# Altium PCB Grant..PcbDoc (part 1 of 5)
Units mil, origin at the board's own origin, x right, y up, seen from the top; angles counter-clockwise.
Board outline 2981 x 2481 mil, 2 copper layers (Top Layer, Bottom Layer), stack 57 mil thick; 181 components, 108 nets, 631 pads, 224 vias.
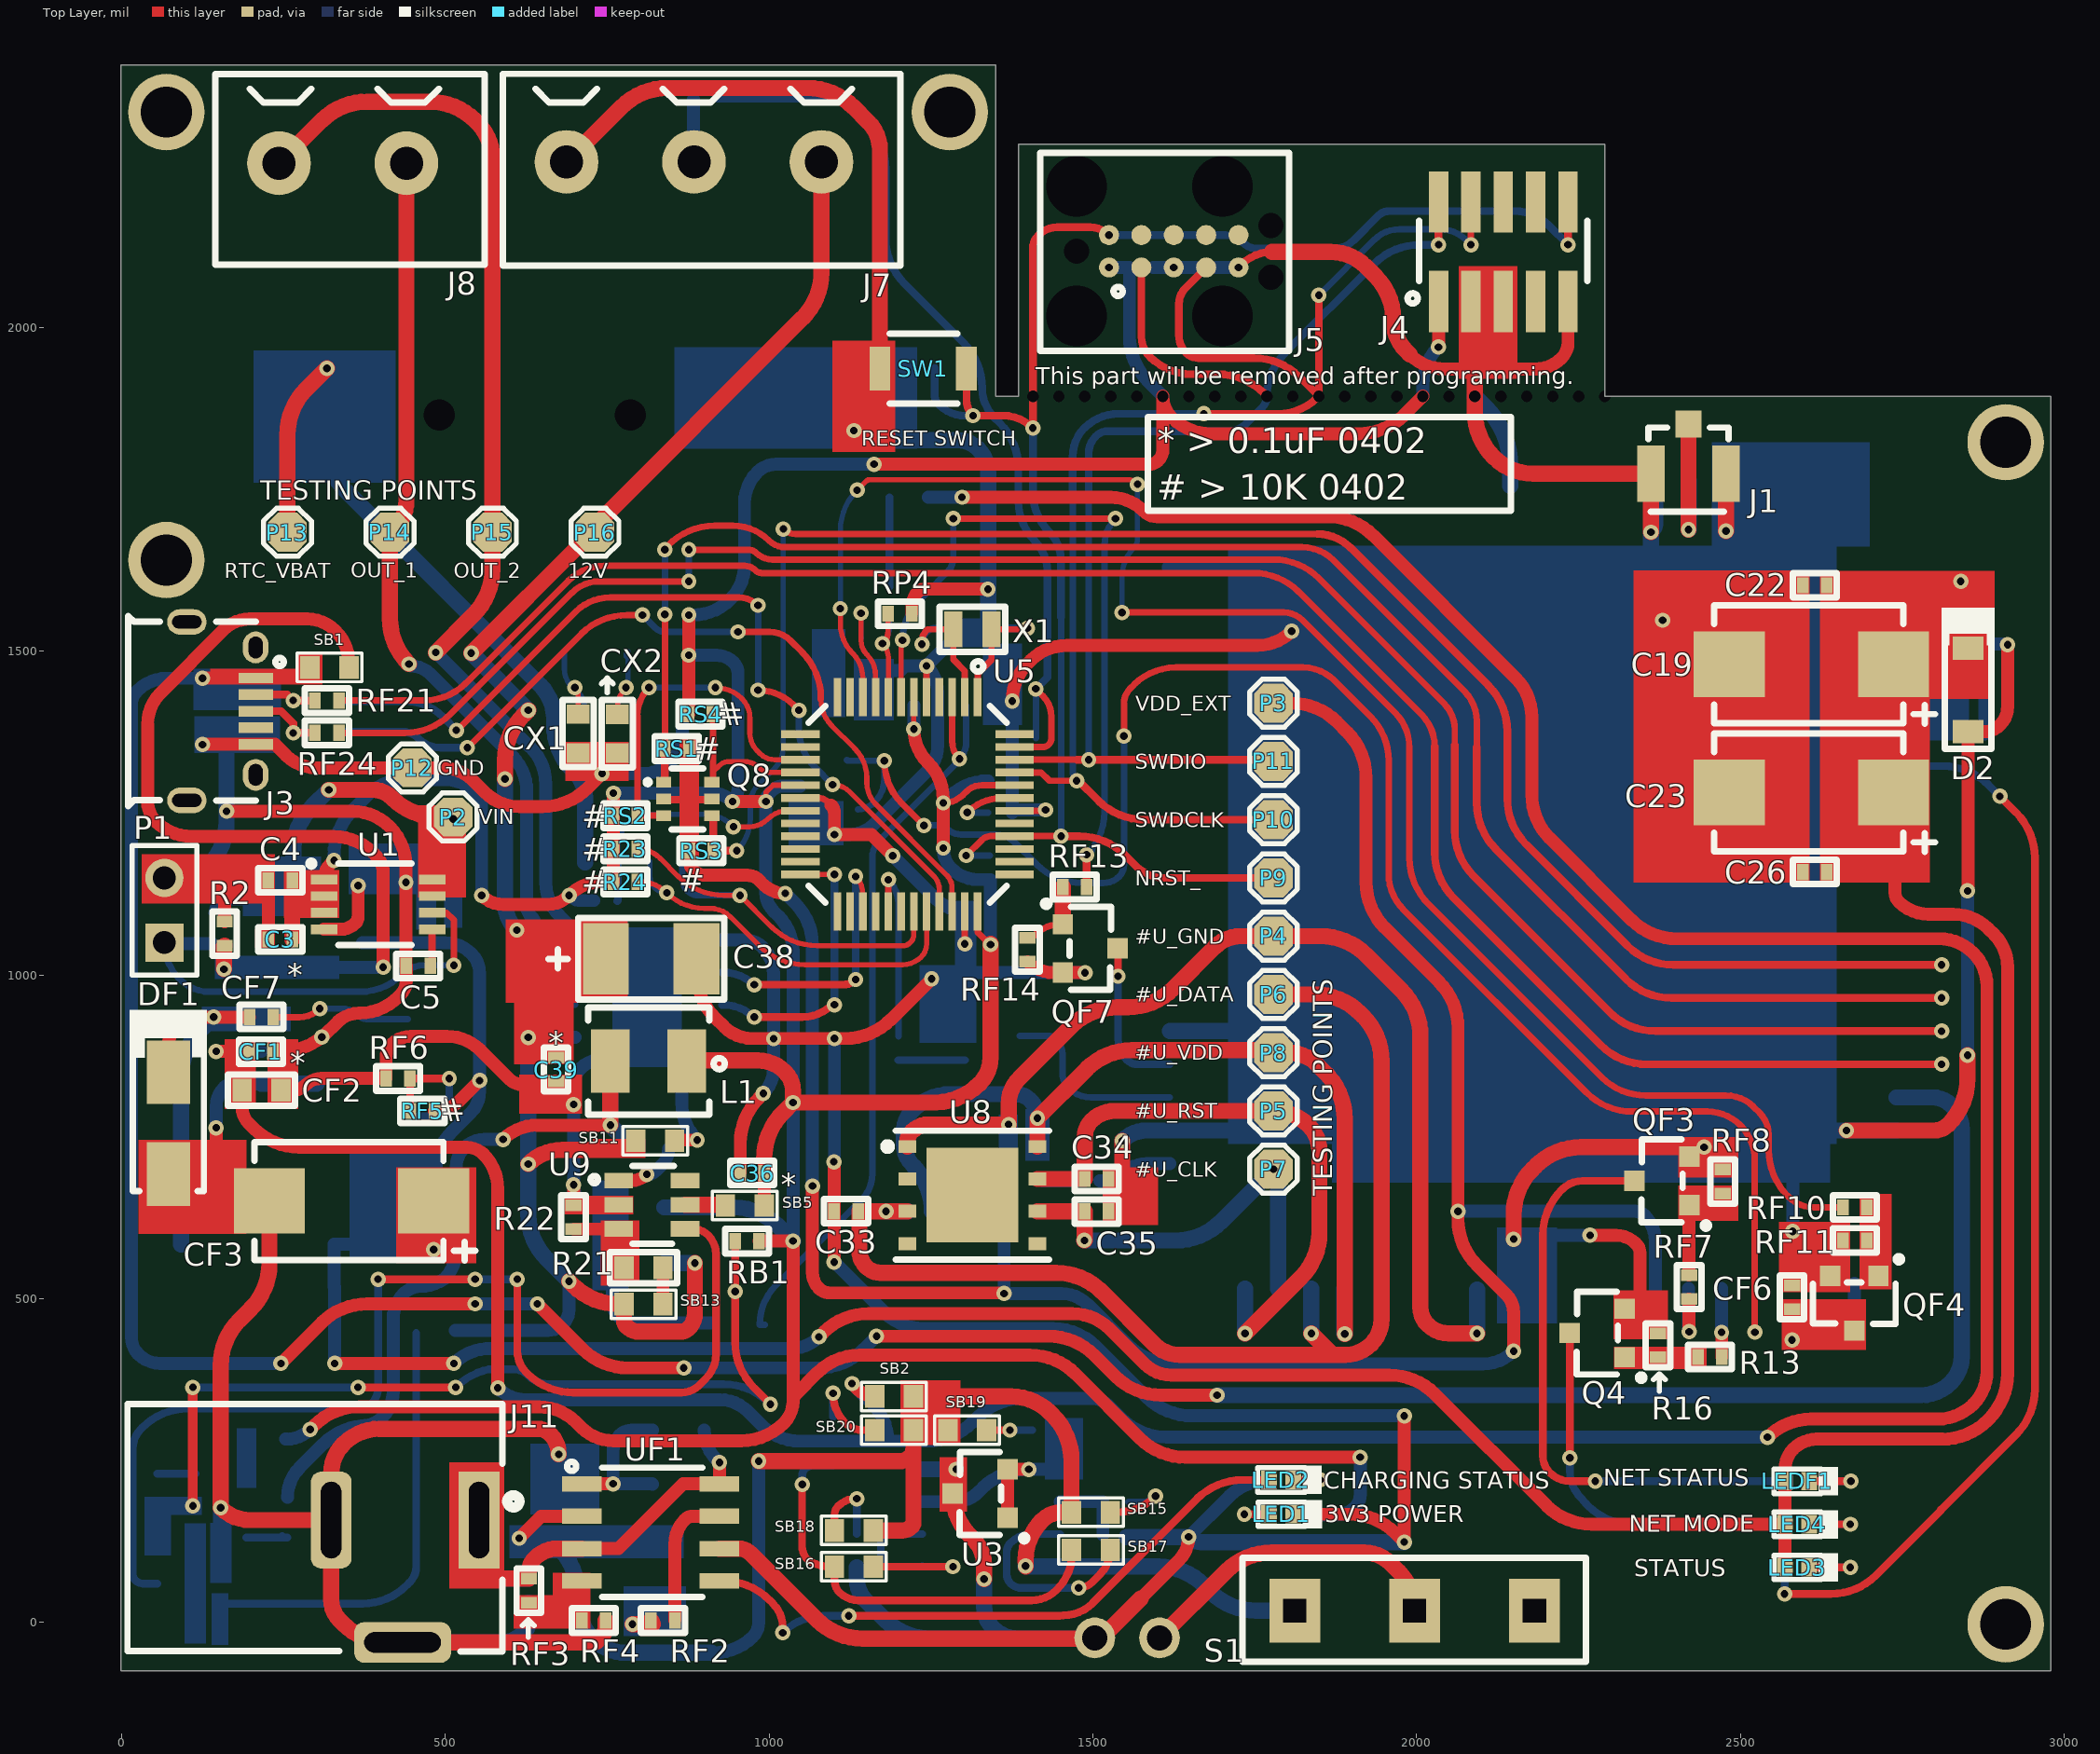
[diagram p0: Top Layer view]
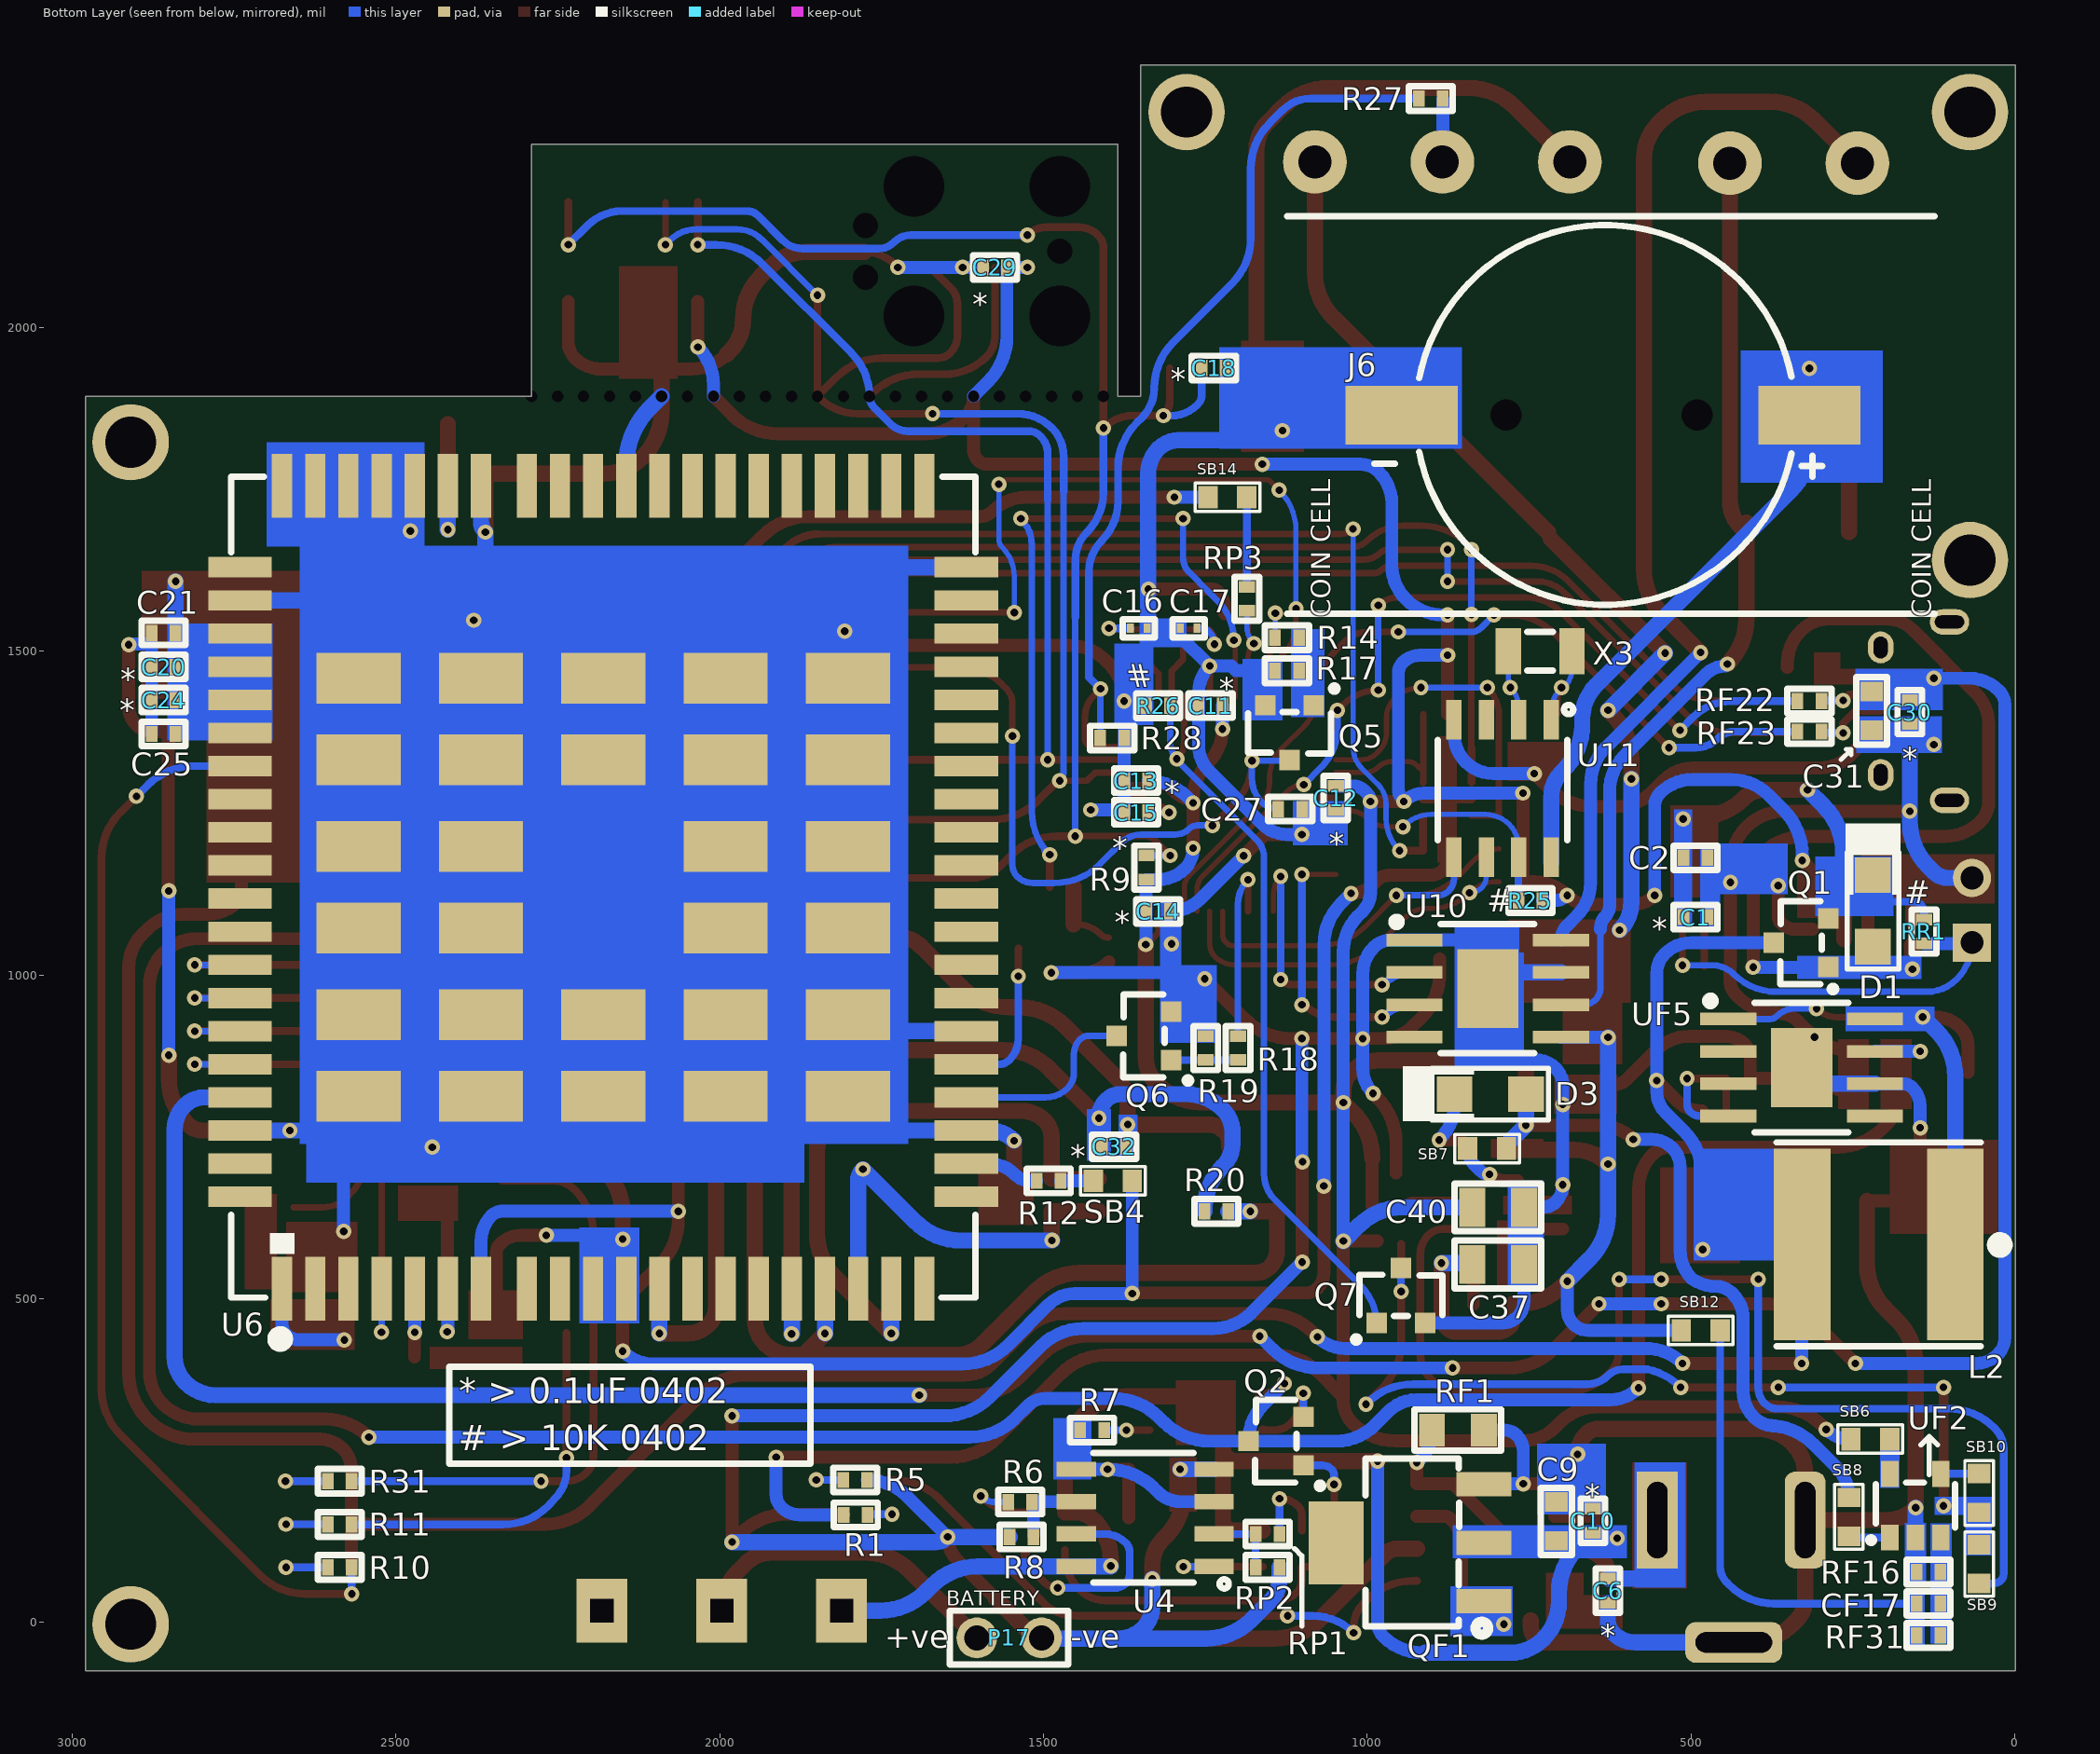
[diagram p1: Bottom Layer view, seen from below]
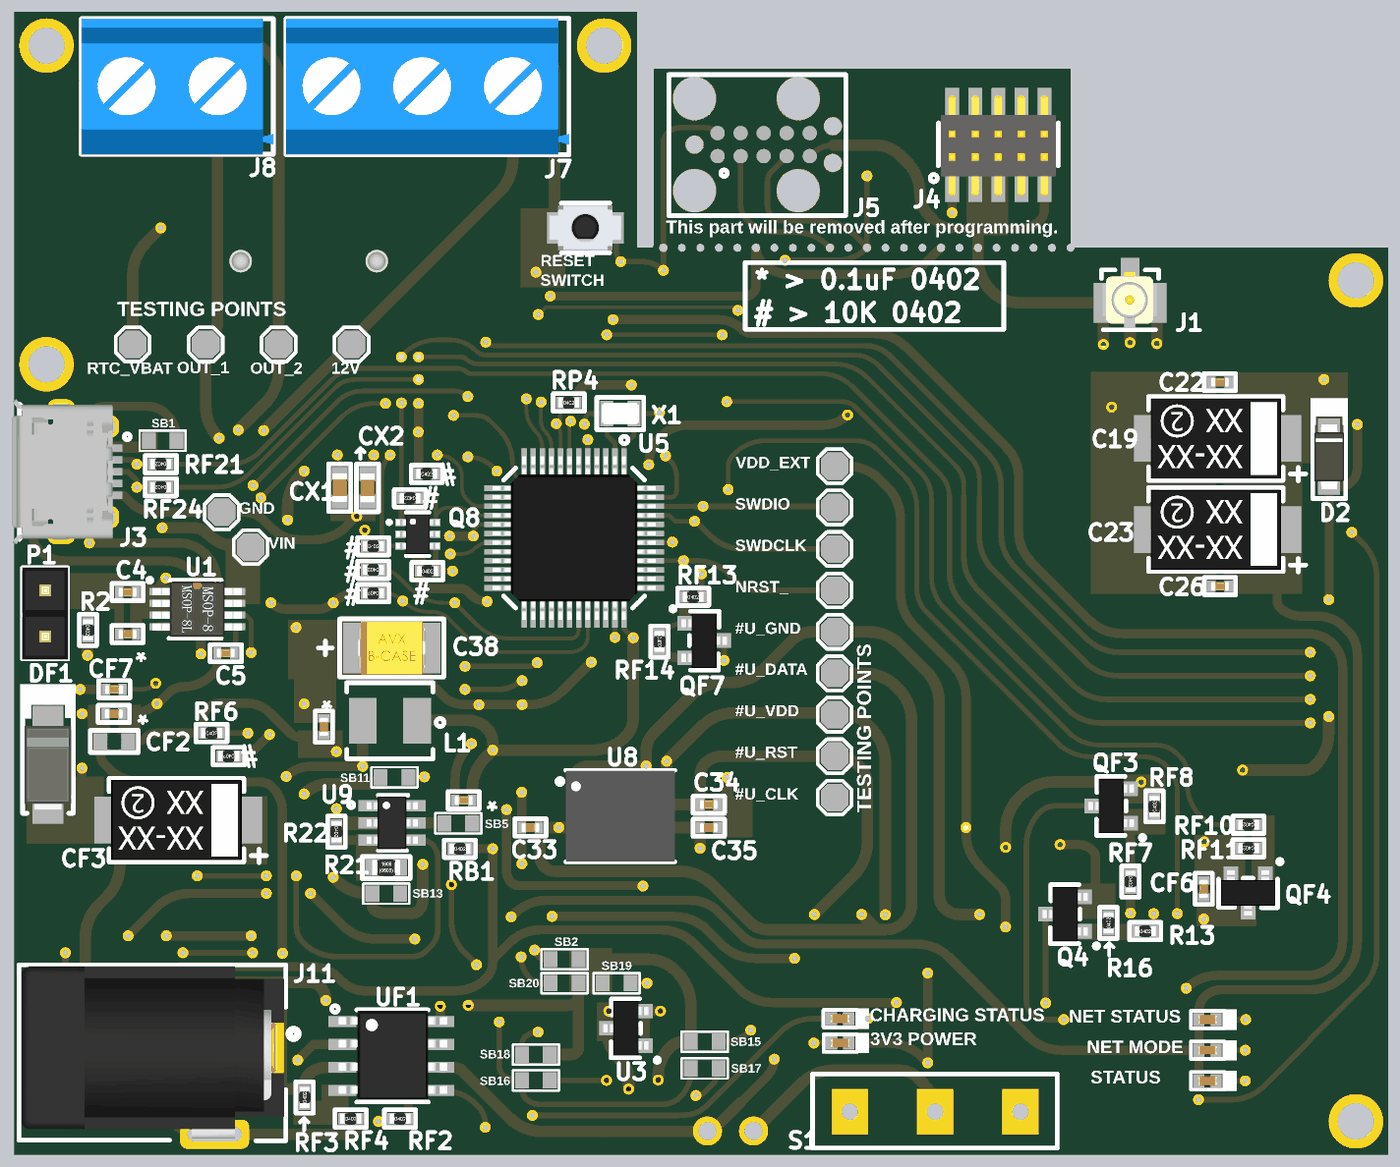
[diagram p4: 3D render of the assembled board from above, using the file's embedded part models]
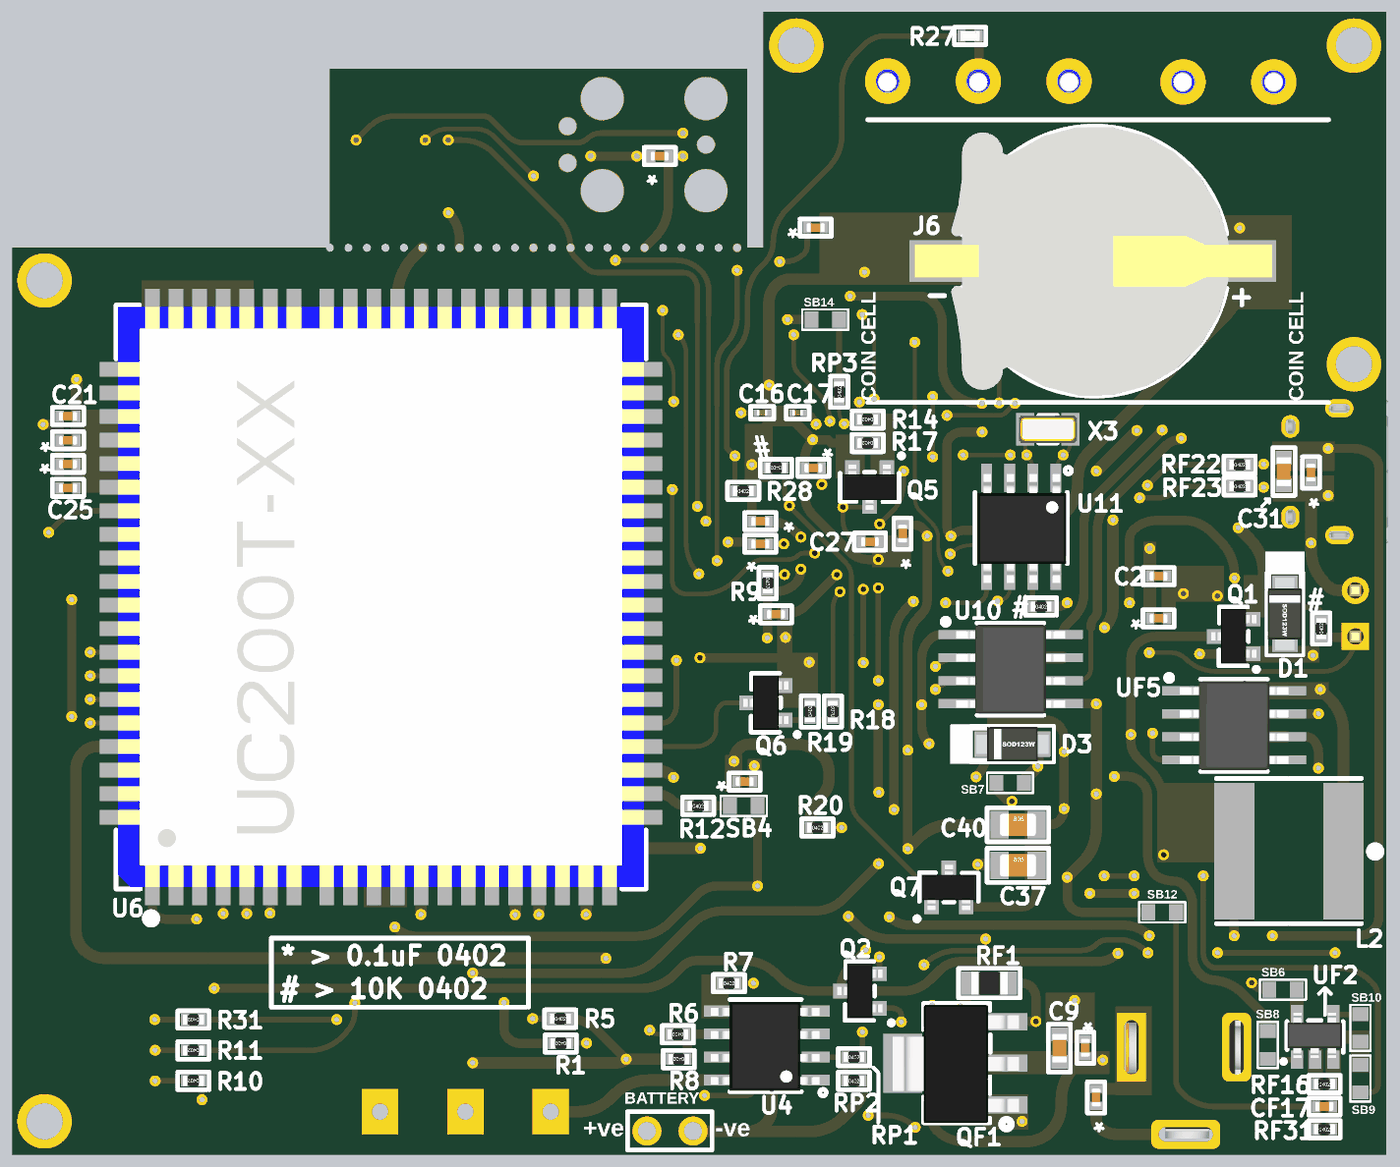
[diagram p5: 3D render of the assembled board from below, using the file's embedded part models]

## Layer stack, top to bottom
Top Solder: solder mask 3, Solder Resist, Dk 3.5
Top Layer: signal copper 10
Dielectric 1: dielectric 37, FR-4, Dk 4.8
Bottom Layer: signal copper 10
Bottom Solder: solder mask 3, Solder Resist, Dk 3.5

## Board outline
-1,-75 -1,2406 1350,2406 1350,1894 1385,1894 1385,2283 2290.83,2283 2290.83,1894 2980,1894 2980,-75

## Design rules (kind name [scope] priority, off if disabled: settings)
Clearance [All] p1: gap=7 ignorepadtopadclearanceinfootprint=FALSE
Height [All] p1: minheight=0 maxheight=10000 prefheight=500
HoleSize [All] p1: absolutevalues=TRUE maxlimit=1000 minlimit=1 maxpercent=80.000 minpercent=20.000
HoleToHoleClearance [All] p1: gap=2 allowstackedmicrovias=TRUE
MinimumSolderMaskSliver [All] p1: minsoldermaskwidth=1
PolygonConnect [All] p1: connectstyle=Relief reliefconductorwidth=10 reliefentries=4 polygonreliefangle="90 Angle" airgapwidth=10
RoutingVias [All] p1: holewidth=11.81 width=23.62 viastyle="Through Hole" minholewidth=11.81 minwidth=23.62 maxholewidth=19.68 maxwidth=39.37
SilkToSilkClearance [All] p1: silktosilkclearance=0
SilkToSolderMaskClearance [IsPad] p1: minsilkscreentomaskgap=0 clearancetoexposedcopper=TRUE
SolderMaskExpansion SolderMaskExpansion_1 [not IsVia] p1: expansion=4
SolderMaskExpansion [IsVia] p2: expansion=4 soldermaskfromhole=TRUE
Width [All] p1: maxlimit=50 minlimit=8 preferedwidth=12 minimp=50.000000 maximp=50.000000 favimp=50.000000
24 further rules are at their usual default settings.

## Classes and differential pairs
component class U_Power_Section: C1 C2 C3 C4 C5 CF1 CF2 CF3 CF7 D1 DF1 L2 LED1 P1 P2 Q1 R1 R2 RF5 RF6 RR1 SB1 U1 UF5
component class U_Peripheral_Section: C36 C37 C38 C39 C40 CF17 CX1 CX2 D3 L1 Q7 R21 R22 R23 R24 R25 R26 R27 R28 RB1 RF16 RF31 SB5 SB6 SB7 SB8 SB9 SB10 SB11 SB12 SB13 U9 U10 U11 UF2 X3
component class U_Controller_Section: C11 C12 C13 C14 C15 C16 C17 C18 Q8 R9 RS1 RS2 RS3 RS4 SW1 U5 X1
component class U_Connector_Section: C29 C30 C31 C32 C33 C34 C35 J3 J4 J5 J6 J7 J8 J11 P4 P5 P6 P7 P8 P9 P10 P11 P12 P13 P14 P15 P16 P17 R20 RF21 RF22 RF23 RF24 S1 U8
component class U_Battery_Management_Section: C6 C9 C10 LED2 Q2 QF1 R5 R6 R7 R8 RF1 RF2 RF3 RF4 RP1 RP2 RP3 RP4 SB2 SB14 SB15 SB16 SB17 SB18 SB19 SB20 U3 U4 UF1
component class "U_3G Modem_Section": C19 C20 C21 C22 C23 C24 C25 C26 C27 CF6 D2 J1 LED3 LED4 LEDF1 P3 Q4 Q5 Q6 QF3 QF4 QF7 R10 R11 R12 R13 R14 R16 R17 R18 R19 R31 RF7 RF8 RF10 RF11 RF13 RF14 SB4 U6

## Components (designator, comment, footprint, x,y, rotation, side; value= is the part's Value field where it differs from the comment)
C1 "0.1uF" Cap0402 493,1089.39 r180 bottom
C2 "1uF" Cap0402 493,1181 r180 bottom
C3 "0.1uF" Cap0402 245,1055 r180 top
C4 "1uF" Cap0402 245,1146 r180 top
C5 "10nF" Cap0402 458,1014 r0 top
C6 "0.1uF" Cap0402 628.34,49 r270 bottom
C9 "10uF" Cap0603 708,156 r270 bottom
C10 "0.1uF" Cap0402 652,157 r90 bottom
C11 "0.1uF" Cap0402 1242,1416 r0 bottom
C12 "0.1uF" Cap0402 1048.38,1273.49 r270 bottom
C13 "0.1uF" Cap0402 1357,1300 r0 bottom
C14 "0.1uF" Cap0402 1323,1098.29 r180 bottom
C15 "0.1uF" Cap0402 1357,1251 r0 bottom
C16 "20pF" "Cap 0201" 1353.01,1535.65 r0 bottom
C17 "20pF" "Cap 0201" 1276,1535.65 r180 bottom
C18 "0.1uF" Cap0402 1237,1938 r180 bottom
C19 "100uF" 16TQC100MYF 2609.85,1480 r180 top
C20 "0.1uF" Cap0402 2859,1475.82 r0 bottom
C21 "10pF" Cap0402 2859,1528.25 r0 bottom
C22 "33pF" Cap0402 2615,1602 r180 top
C23 "100uF" 16TQC100MYF 2609.85,1282 r180 top
C24 "0.1uF" Cap0402 2859,1424.32 r0 bottom
C25 "10pF" Cap0402 2859,1372.35 r0 bottom
C26 "33pF" Cap0402 2615,1159 r180 top
C27 "10nF" Cap0402 1119,1256 r0 bottom
C29 "0.1uF" Cap0402 1575.12,2093 r0 bottom
C30 "0.1uF" Cap0402 162,1406 r270 bottom
C31 "4.7UF" Cap0603 221,1408 r90 bottom
C32 "0.1uF" Cap0402 1391,735 r180 bottom
C33 "33pF" Cap0402 1119,635 r180 top
C34 "33pF" Cap0402 1506,685 r0 top
C35 "33pF" Cap0402 1506,635 r0 top
C36 "0.1uF" Cap0402 974,694 r180 top
C37 "22uF" Cap0805 798,553 r180 bottom
C38 "4.7UF" TAJB475K035RNJ 817,1022 r180 top locked
C39 "0.1uF" Cap0402 671,854 r270 top
C40 "22uF" Cap0805 798,641 r180 bottom
CF1 "0.1uF" Cap0402 215,882 r0 top
CF2 "10uF" Cap0603 216,822 r180 top
CF3 "220uF" CAP2917 355,651 r180 top
CF6 "10nF" Cap0402 2580,502 r270 top
CF7 "10nF" Cap0402 216,935 r180 top
CF17 "220pF" Cap0402 133,29 r0 bottom
CX1 "12pF" Cap0603 705,1373 r270 top locked
CX2 "12pF" Cap0603 765.5,1372.79 r270 top locked
D1 "PMEG3010ER,115" SOD123W 219,1099 r90 bottom
D2 "BZD27C5V1P_R1_00001" BZD27C5V1P_R1_00001 2852,1440.35 r90 top value=Custom
D3 "PMEG3010ER,115" SOD123W 810,816 r0 bottom
DF1 "B340A-13-F" B340A-13-F 72,771 r270 top
J1 "U.FL-R-SMT-1(80)" U.FL-R-SMT-1(80) 2420,1814.65 r180 top
J3 "C10418" C10418 207,1407.57 r270 top locked
J4 "20021121-00010C4LF" 20021121-00010C4LF 2134,2117.23 r0 top locked
J5 "TC2050-IDC" TC2050-IDC 1475,2118 r0 top locked
J6 "CR1220-2" CR1220-2 632,1865 r0 bottom locked value=Cuctom
J7 "WJ301V-5.0-3P" WJ301V-5.0-3P 1080.85,2256 r180 top locked value=Custom
J8 "WJ301V-5.0-2P" WJ301V-5.0-2P 243,2254 r180 top locked value=Custom
J11 "694106301002" 694106301002 552,158 r0 top locked
L1 "MS0420-100M" MS0420-100M 813.94,867 r180 top locked value=10uH
L2 "SNR8040K-150M" SNR8040K-150M 210,584 r0 bottom locked value=15uH
LED1 "TJ-S1005SW4TGLC2R-A5" "LED 0402" 1791,167 r0 top value=Custom
LED2 "TJ-S1005SW4TGLC2R-A5" "LED 0402" 1790.7,220 r0 top value=Custom
LED3 "TJ-S1005SW4TGLC6B-A5" "LED 0402" 2588,85 r0 top value=Custom
LED4 "TJ-S1005SW4TGLC7K-A5" "LED 0402" 2588,151.5 r0 top value=Custom
LEDF1 "TJ-S1005SW4TGLC7K-A5" "LED 0402" 2588,218 r0 top value=Custom
P1 "61300211121" HDR1X2 66,1050 r90 top locked
P2 "TEST POINT" "TEST POINT" 512,1244 r0 top
P3 "Test Point" "TEST POINT" 1779,1420 r0 top
P4 "Test Point" "TEST POINT" 1779,1060 r0 top
P5 "Test Point" "TEST POINT" 1779,790 r0 top
P6 "Test Point" "TEST POINT" 1779,970 r0 top
P7 "Test Point" "TEST POINT" 1779,700 r0 top
P8 "Test Point" "TEST POINT" 1779,880 r0 top
P9 "Test Point" "TEST POINT" 1779,1150 r0 top
P10 "Test Point" "TEST POINT" 1779,1240 r0 top
P11 "Test Point" "TEST POINT" 1779,1330 r0 top
P12 "Test Point" "TEST POINT" 449,1320 r0 top
P13 "Test Point" "TEST POINT" 256,1684 r0 top
P14 "Test Point" "TEST POINT" 414.33,1684 r0 top
P15 "Test Point" "TEST POINT" 572.67,1684 r0 top
P16 "Test Point" "TEST POINT" 731,1684 r0 top
P17 "Solder Pads" "Solder Pads" 1552,-25 r180 bottom locked
Q1 "DMP2045U-7" SOT23-3 330,1050 r90 bottom locked
Q2 "PMV65XP,215" SOT23-3 1141,280 r90 bottom locked
Q4 "BSS138LT1G" SOT23-3 2279,447 r90 top
Q5 "BSS138LT1G" SOT23-3 1120,1374.37 r0 bottom locked
Q6 "BSS138LT1G" SOT23-3 1345,906 r90 bottom
Q7 "DMN13H750S-7" SOT23-3 948,505 r180 bottom
Q8 "BSS138PS,115" BSS138PS,115 874.5,1271.94 r0 top
QF1 "FZT788BTA" FZT788BTA 934,123 r90 bottom locked
QF3 "BSS138LT1G" SOT23-3 2379,682 r90 top
QF4 "BSS138LT1G" SOT23-3 2676,493 r180 top locked
QF7 "BSS138LT1G" SOT23-3 1496,1041 r270 top
R1 "470R" Res0402 1790,166 r0 bottom
R2 "100K" Res0402 159,1064 r270 top
R5 "2K" Res0402 1791,220 r180 bottom
R6 "80.6K" Res0402 1536,186 r0 bottom
R7 "30.9K" Res0402 1425,297 r180 bottom
R8 "20K" Res0402 1534,132 r0 bottom
R9 "20K" Res0402 1341,1166 r270 bottom
R10 "2.2K" Res0402 2587,85 r0 bottom
R11 "2.2K" Res0402 2587,151 r0 bottom
R12 "4.7K" Res0402 1492,682 r180 bottom
R13 "4.7K" Res0402 2453,410 r0 top
R14 "4.7K" Res0402 1124,1521 r0 bottom
R16 "47K" Res0402 2373,428 r90 top
R17 "47K" Res0402 1124,1470 r0 bottom
R18 "4.7K" Res0402 1199.61,887 r90 bottom
R19 "47K" Res0402 1249.5,887 r90 bottom
R20 "15K" Res0402 1233,635 r180 bottom
R21 "1.4M" Res0603 806,548 r0 top
R22 "71.5K" Res0402 698,626 r270 top
R23 "10K" Res0402 778,1194.75 r180 top
R24 "10K" Res0402 778,1144 r180 top
R25 "10K" Res0402 748,1115 r180 bottom
R26 "10K" Res0402 1323,1416 r0 bottom
R27 "133K" Res0402 902,2354 r180 bottom
R28 "49.9K" Res0402 1394,1366 r180 bottom
R31 "2.2K" Res0402 2587,218 r0 bottom
RB1 "100K" Res0402 966,589 r0 top
RF1 "0.068R" "RES 0805" 860,297 r0 bottom
RF2 "1K" Res0402 836,3 r0 top
RF3 "1M" Res0402 629,49 r90 top
RF4 "1M" Res0402 729,3 r0 top
RF5 "10K" Res0402 464.5,790 r180 top
RF6 "4.7K" Res0402 427,840.26 r0 top
RF7 "4.7K" Res0402 2421,517.89 r270 top
RF8 "47K" Res0402 2473,681 r90 top
RF10 "4.7K" Res0402 2677,641 r180 top
RF11 "47K" Res0402 2677,590 r180 top
RF13 "4.7K" Res0402 1472,1136 r0 top
RF14 "47K" Res0402 1399,1039 r270 top
RF16 "13.3K" Res0402 133,78 r180 bottom
RF21 "0R" Res0402 317,1424 r180 top
RF22 "0R" Res0402 317,1423 r180 bottom
RF23 "0R" Res0402 317,1376 r180 bottom
RF24 "0R" Res0402 317,1374 r180 top
RF31 "118K" Res0402 133,-20 r180 bottom
RP1 "60.4K" Res0402 1154,136.5 r180 bottom
RP2 "20K" Res0402 1154,85 r180 bottom
RP3 "62K" Res0402 1186,1581 r90 bottom
RP4 "40.2K" Res0402 1202,1558 r0 top
RR1 "10K" Res0402 140,1067 r90 bottom
RS1 "10K" Res0402 857.5,1349.94 r180 top
RS2 "10K" Res0402 778,1246 r0 top
RS3 "10K" Res0402 895.5,1191.94 r0 top
RS4 "10K" Res0402 894,1403 r0 top
S1 "SS-12D06L5" SS-12D06L5 1811.96,18 r0 top locked value=Custom
SB1 "Solder Bridge" "Solder Bridge" 321,1475 r0 top
SB2 "Solder Bridge" "Solder Bridge" 1193,349 r180 top
SB4 "Solder Bridge" "Solder Bridge" 1393,682 r0 bottom
SB5 "Solder Bridge" "Solder Bridge" 962.5,644 r180 top
SB6 "Solder Bridge" "Solder Bridge" 223,283 r180 bottom
SB7 "Solder Bridge" "Solder Bridge" 815,732 r180 bottom
SB8 "Solder Bridge" "Solder Bridge" 256,163 r90 bottom
SB9 "Solder Bridge" "Solder Bridge" 55,90 r90 bottom locked
SB10 "Solder Bridge" "Solder Bridge" 55,200 r90 bottom locked
SB11 "Solder Bridge" "Solder Bridge" 824,744 r180 top
SB12 "Solder Bridge" "Solder Bridge" 485,451 r0 bottom
SB13 "Solder Bridge" "Solder Bridge" 806,491.5 r180 top
SB14 "Solder Bridge" "Solder Bridge" 1216,1738 r180 bottom
SB15 "Solder Bridge" "Solder Bridge" 1497,170 r0 top
SB16 "Solder Bridge" "Solder Bridge" 1131,86 r180 top
SB17 "Solder Bridge" "Solder Bridge" 1497,112 r180 top
SB18 "Solder Bridge" "Solder Bridge" 1131,142 r180 top
SB19 "Solder Bridge" "Solder Bridge" 1306,297 r0 top
SB20 "Solder Bridge" "Solder Bridge" 1193,297 r180 top
SW1 "B3U-1000P" B3U-1000P 1238,1937 r180 top
U1 "NCP3335ADM330R2G" NCP3335ADM330R2G 396,1109 r0 top locked
U3 "TLV431BFTA" SOT23-3 1326,199 r90 top locked
U4 "LM393DT" LM393DT 1343,161.5 r0 bottom locked
U5 "SAMD21G18A-AUT" SAMD21G18A-AUT 1213.73,1263.65 r270 top locked
U6 "UC200T" UC200T 2179.98,1135.73 r90 bottom locked value=Custom
U8 "SIM-ST-MFF2" SIM-ST-MFF2 1314,660 r0 top locked
U9 "AX5523CA" SOT-23-6 819,645 r0 top locked
U10 "DRV8871DDAR" DRV8871DDAR 813.81,979 r180 bottom locked
U11 "MCP7940MT-I/SN" MCP7940MT-I/SN 791,1288 r270 bottom locked
UF1 "BQ2057WSNTR" BQ2057WSNTR 817,139 r0 top locked
UF2 "LMR62014XMF/NOPB" SOT23-5 192.74,131 r180 bottom locked
UF5 "TPS5430QDDARQ1" TPS5430QDDARQ1 329,857 r180 bottom locked
X1 "SC-20S,32.768kHz,20PPM,9pF" SC-20S,32.768kHz,20PPM,9pF 1314,1534 r180 top value=32.768KHz
X3 "NX3215SA-32.768K-STD-MUA-8" "2-SMD, No Lead" 733,1500 r180 bottom

## Footprints (in the part's own frame and the unit in brackets; to place one, negate y for a bottom-side part, rotate by r counter-clockwise, add the part's x,y. Pads: shape width x height; smd on the part's side, far side on the other; paste and mask are expansions set on the pad)
"2-SMD, No Lead" [mm] "NX3215SA-32.768K-STD-MUA-8"
  rect 1x1.8 smd: 1(-1.25,0) 2(1.25,0)
  silkscreen extent -0.51,-0.76 0.51,0.76, body extent -1.6,-0.75 1.6,0.75, height 0.8
16TQC100MYF [mm]
  rect 2.79x2.57 smd: 1(-3.22,0) 2(3.22,0)
  silkscreen extent -4.85,-2.31 3.81,2.34, body extent -3.49,-2.21 3.7,2.21, height 2.88
20021121-00010C4LF [mm]
  rect 0.76x2.4 smd: 1(-2.54,-1.95) 2(-2.54,1.95) 3(-1.27,-1.95) 4(-1.27,1.95) 5(0,-1.95) 6(0,1.95) 7(1.27,-1.95) 8(1.27,1.95) 9(2.54,-1.95) 10(2.54,1.95)
  silkscreen extent -3.75,-2.03 3.3,1.22, body extent -3.17,-2.78 3.18,2.72, height 4.5
694106301002 [mm]
  rect 1.6x3.8 hole 0.8 slot 3 at 90 deg: 1(0,0)
  rrect50% 1.6x3.8 hole 0.8 slot 3 at 90 deg: 2(-5.8,0)
  rrect50% 3.8x1.6 hole 0.8 slot 3 at 0 deg: 3(-3,-4.8)
  silkscreen extent -13.79,-5.16 1.59,4.55, body extent -13.68,-5.03 0.82,4.47, height 10.85
B3U-1000P [mm] "SWITCH TACTILE SPST-NO 0.05A 12V"
  rect 0.82x1.72 smd: 1(-1.7,0) 2(1.7,0)
  silkscreen extent -1.35,-1.37 1.32,1.37, body extent -2,-1.26 2,1.24, height 1.6
B340A-13-F [mm]
  rect 2.5x1.7 smd: 1(-2,0) 2(2,0)
  silkscreen extent -4.44,-1.52 2.67,1.52, body extent -2.6,-1.3 2.6,1.3, height 1
BQ2057WSNTR [mm]
  rect 1.55x0.6 smd: 1(-2.7,1.905) 2(-2.7,0.635) 3(-2.7,-0.635) 4(-2.7,-1.905) 5(2.7,-1.905) 6(2.7,-0.635) 7(2.7,0.635) 8(2.7,1.905)
  silkscreen extent -3.28,-2.54 2.03,2.77, body extent -2.91,-2.41 3.09,2.49, height 1.65
BSS138PS,115 [mm]
  rect 0.6x0.42 smd: 1(-0.95,0.65) 2(-0.95,0) 3(-0.95,-0.65) 4(0.95,-0.65) 5(0.95,0) 6(0.95,0.65)
  silkscreen extent -1.65,-1.19 0.61,1.19, body extent -1.2,-1.1 1.2,1.1, height 1.09
BZD27C5V1P_R1_00001 [mm]
  rect 0.91x1.22 smd: 1(-1.64,0) 2(1.64,0)
  silkscreen extent -2.31,-1.04 3.23,1.04, body extent -1.79,-0.83 1.79,0.82, height 0.95
C10418 [mm] "USB - Micro B Female USB 2 5 SMD USB Connectors RoHS"
  rect 0.42x1.35 smd: 1(-1.3,0) 2(-0.65,0) 3(0,0) 4(0.65,0) 5(1.3,0)
  oval 1.25x1 hole 0.55 slot 0.85 at 0 deg: MH1(-2.5,0) MH2(2.5,0)
  oval 1x1.55 hole 0.5 slot 1.15 at 90 deg: MH3(-3.5,-2.7) MH4(3.5,-2.7)
  silkscreen extent -3.73,-5 3.72,1.1, body extent -7.67,-5.38 4.02,0.2, height 2.72
Cap0402 [mil]
  rect 18x25 smd: 1(-18.5,0) 2(18.5,0)
  silkscreen extent -34,-19 34,19, body extent -20,-10 20,10, height 19
Cap0603 [mil]
  rect 30x35 smd: 1(30,0) 2(-30,0)
  silkscreen extent -52,-24 52,24, body extent -31,-16 32,16, height 34
Cap0805 [mil] "SMD 0805"
  rect 40x60 smd: 1(-40,0) 2(40,0)
  silkscreen extent -67,-37 67,37, body extent -39,-25 39,25, height 30
CAP2917 [mm]
  rect 2.79x2.57 smd: 1(-3.22,0) 2(3.22,0)
  silkscreen extent -4.85,-2.31 3.81,2.34, body extent -3.49,-2.21 3.7,2.21, height 2.88
"Cap 0201" [mm]
  rect 0.27x0.37 smd: 1(-0.33,0) 2(0.33,0)
  silkscreen extent -0.64,-0.36 0.64,0.36, body extent -0.3,-0.16 0.3,0.17, height 0.21
CR1220-2 [mm]
  rect 4x2.3 smd: 1(-8,0)
  rect 4.4x2.3 smd: 2(8,0)
  round 0 hole 1.22: MH1(-3.6,0) MH2(3.9,0)
  silkscreen extent -8.5,-7.45 9.07,7.45, body extent -9.8,-7.45 9.9,7.45, height 4
DRV8871DDAR [mm]
  rect 2.2x0.5 smd: 1(-2.875,1.905) 2(-2.875,0.635) 3(-2.875,-0.635) 4(-2.875,-1.905) 5(2.875,-1.905) 6(2.875,-0.635) 7(2.875,0.635) 8(2.875,1.905)
  rect 2.4x3.1 smd: 9(0,0)
  silkscreen extent -3.66,-2.54 1.83,2.69, body extent -3,-2.46 3,2.44, height 1.68
FZT788BTA [mm]
  rect 0.95x2.15 smd: 1(-2.3,-2.9) 2(0,-2.9) 3(2.3,-2.9)
  rect 3.25x2.15 smd: 4(0,2.9)
  silkscreen extent -3.6,-3.07 3.3,1.75, body extent -3.28,-3.51 3.22,3.45, height 1.65
HDR1X2 [mm] "CONN HEADER VERT 2POS 2.54MM"
  rect 1.5x1.5 hole 0.9: 1(0,0)
  round 1.5 hole 0.9: 2(2.54,0)
  silkscreen extent -1.27,-1.27 3.81,1.27, body extent -1.27,-1.27 3.81,1.27, height 8.44
"LED 0402" [mm]
  rect 0.62x0.72 smd: 1(-0.475,0) 2(0.475,0)
  silkscreen extent -0.91,-0.56 1.6,0.56, body extent -0.5,-0.25 0.51,0.25, height 0.45
LM393DT [mm]
  rect 1.55x0.6 smd: 1(-2.7,1.905) 2(-2.7,0.635) 3(-2.7,-0.635) 4(-2.7,-1.905) 5(2.7,-1.905) 6(2.7,-0.635) 7(2.7,0.635) 8(2.7,1.905)
  silkscreen extent -3.28,-2.54 2.03,2.77, body extent -2.91,-2.41 3.09,2.49, height 1.65
MCP7940MT-I/SN [mm]
  rect 1.55x0.6 smd: 1(-2.7,1.905) 2(-2.7,0.635) 3(-2.7,-0.635) 4(-2.7,-1.905) 5(2.7,-1.905) 6(2.7,-0.635) 7(2.7,0.635) 8(2.7,1.905)
  silkscreen extent -3.28,-2.54 2.03,2.77, body extent -2.91,-2.41 3.09,2.49, height 1.65
MS0420-100M [mm]
  rect 1.52x2.5 smd: 1(-1.5,0) 2(1.5,0)
  silkscreen extent -2.99,-2.1 2.37,2.1
NCP3335ADM330R2G [mm]
  rect 1.04x0.38 smd: 1(-2.12,0.975) 2(-2.12,0.325) 3(-2.12,-0.325) 4(-2.12,-0.975) 5(2.12,-0.975) 6(2.12,-0.325) 7(2.12,0.325) 8(2.12,0.975)
  silkscreen extent -2.73,-1.6 1.32,1.71, body extent -2.46,-1.53 2.46,1.52, height 1.01
Res0402 [mil]
  rect 18x25 smd: 1(-18.5,0) 2(18.5,0)
  silkscreen extent -34,-19 34,19, body extent -23,-11 23,11, height 16
Res0603 [mil]
  rect 30x35 smd: 1(30,0) 2(-30,0)
  silkscreen extent -52,-24 52,24, body extent -31,-17 31,17, height 18
"RES 0805" [mil] "SMD 0805"
  rect 40x50 smd: 1(-40,0) 2(40,0)
  silkscreen extent -67,-32 67,32, body extent -39,-25 39,24, height 24
SAMD21G18A-AUT [mm] "IC MCU 32BIT 256KB FLASH 48TQFP"
  rect 1.5x0.3 smd: 1(-4.2,2.75) 2(-4.2,2.25) 3(-4.2,1.75) 4(-4.2,1.25) 5(-4.2,0.75) 6(-4.2,0.25) 7(-4.2,-0.25) 8(-4.2,-0.75) 9(-4.2,-1.25) 10(-4.2,-1.75) 11(-4.2,-2.25) 12(-4.2,-2.75) 25(4.2,-2.75) 26(4.2,-2.25) 27(4.2,-1.75) 28(4.2,-1.25) 29(4.2,-0.75) 30(4.2,-0.25) 31(4.2,0.25) 32(4.2,0.75) 33(4.2,1.25) 34(4.2,1.75) 35(4.2,2.25) 36(4.2,2.75)
  rect 0.3x1.5 smd: 13(-2.75,-4.2) 14(-2.25,-4.2) 15(-1.75,-4.2) 16(-1.25,-4.2) 17(-0.75,-4.2) 18(-0.25,-4.2) 19(0.25,-4.2) 20(0.75,-4.2) 21(1.25,-4.2) 22(1.75,-4.2) 23(2.25,-4.2) 24(2.75,-4.2) 37(2.75,4.2) 38(2.25,4.2) 39(1.75,4.2) 40(1.25,4.2) 41(0.75,4.2) 42(0.25,4.2) 43(-0.25,4.2) 44(-0.75,4.2) 45(-1.25,4.2) 46(-1.75,4.2) 47(-2.25,4.2) 48(-2.75,4.2)
  silkscreen extent -5.61,-3.89 3.86,3.89, body extent -4.5,-4.5 4.5,4.5, height 1.42
SC-20S,32.768kHz,20PPM,9pF [mm]
  rect 0.7x1.4 smd: 1(-0.75,0) 2(0.75,0)
  silkscreen extent -1.3,-0.89 1.3,0.89, body extent -1.02,-0.6 1.03,0.6, height 0.57
SIM-ST-MFF2 [mm]
  rect 0.71x0.51 smd: 1(-2.55,1.905) 2(-2.55,0.635) 3(-2.55,-0.635) 4(-2.55,-1.905) 5(2.55,-1.905) 6(2.55,-0.635) 7(2.55,0.635) 8(2.55,1.905)
  rect 3.6x3.7 smd: 9(0,0)
  silkscreen extent -3.47,-2.53 3,2.53, body extent -3,-2.5 3,2.5, height 0.82
SNR8040K-150M [mm]
  rect 2.22x7.52 smd: 1(-3,0) 2(3,0)
  silkscreen extent -5,-4 4,4
SOD123W [mm] "DIODE SCHOTTKY 30V 1A SOD123W"
  rect 1.4x1.4 smd: A(-1.4,0) K(1.4,0)
  silkscreen extent -2.29,-1.09 3.43,1.07, body extent -2,-0.95 2,0.95, height 1.1
"Solder Bridge" [mil] "Solder Bridge ON"
  rect 30x35 smd: 1(-30,0) 2(30,0)
  silkscreen extent -50,-22 50,22
"Solder Pads" [mm] "SMD-0402"
  round 1.6 hole 1: 1(-1.295,0.025) 2(1.245,0.025)
  silkscreen extent -2.36,-1.02 2.29,1.09
SOT23-3 [mm] "SOT23, 3-Leads, Body 2.9x1.3mm, Pitch 0.95mm, Lead Span 2.3mm - Reverse Pinning, IPC High Density"
  rect 0.8x0.8 smd: 1(-0.95,-1.075) 2(0.95,-1.075) 3(0,1.075)
  silkscreen extent -1.94,-1.38 1.63,0.81, body extent -1.5,-1.25 1.5,1.25, height 1.05
SOT23-5 [mil] "SOT23-5 Package"
  rect 27x40 smd: 1(0,0) 2(39.37,0) 3(78.74,0) 4(78.74,98.43) 5(0,98.43)
  silkscreen extent -33,-8 100,85, body extent -21,3 98,102, height 43
SOT-23-6 [mm] "IC BAT CHG LI-ION 1 CELL SOT23-6"
  rect 1.12x0.62 smd: 1(-1.3,0.95) 2(-1.3,0) 3(-1.3,-0.95) 4(1.3,-0.95) 5(1.3,0) 6(1.3,0.95)
  silkscreen extent -2.4,-1.52 0.86,1.52, body extent -1.4,-1.45 1.4,1.45, height 1.44
SS-12D06L5 [mm]
  rect 2x2.5 hole 0.9 square: 1(0,0) 2(4.7,0) 3(9.4,0)
  silkscreen extent -2.06,-2.01 11.43,2.08
TAJB475K035RNJ [mil]
  rect 70.87x110 smd: 1(-71,-3) 2(69,-3)
  silkscreen extent -114,-66 158,60, body extent -74,-61 72,55, height 77
TC2050-IDC [mil] "CBL PLUG-OF-NAILS 10-PIN W/LEGS"
  round 30.98 smd: 1(50,-25) 2(100,-25) 3(150,-25) 4(200,-25) 5(250,-25) 6(250,25) 7(200,25) 8(150,25) 9(100,25) 10(50,25)
  round 0 hole 93.5: MP1(0,-100) MP2(225,-100) MP3(225,100) MP4(0,100)
  round 0 hole 39.02: MP5(0,0) MP6(300,-39.96) MP7(300,39.96)
  silkscreen extent -56,-154 328,152
"TEST POINT" [mil]
  oct 60x60 smd: 1(0,0)
  silkscreen extent -37,-37 37,37
TPS5430QDDARQ1 [mm]
  rect 2.2x0.5 smd: 1(-2.875,1.905) 2(-2.875,0.635) 3(-2.875,-0.635) 4(-2.875,-1.905) 5(2.875,-1.905) 6(2.875,-0.635) 7(2.875,0.635) 8(2.875,1.905)
  rect 2.4x3.1 smd: 9(0,0)
  silkscreen extent -3.66,-2.54 1.83,2.69, body extent -3,-2.46 3,2.44, height 1.68
U.FL-R-SMT-1(80) [mm]
  rect 1.02x1.07 smd: 1(0,-0.923)
  rect 1.07x2.2 smd: 2(1.475,1.025) 3(-1.475,1.025)
  silkscreen extent -1.57,-0.79 1.57,2.51, body extent -1.47,-0.69 1.53,2.41, height 1.2
UC200T [mm]
  rect 2.5x0.8 smd: 1(-15.75,12.6) 2(-15.75,11.3) 3(-15.75,10) 4(-15.75,8.7) 5(-15.75,7.4) 6(-15.75,6.1) 7(-15.75,4.8) 8(-15.75,0.4) 9(-15.75,-0.9) 10(-15.75,-2.2) 11(-15.75,-3.5) 12(-15.75,-4.8) 13(-15.75,-6.1) 14(-15.75,-7.4) 15(-15.75,-8.7) 16(-15.75,-10) 17(-15.75,-11.3) 18(-15.75,-12.6) 37(15.75,-12.6) 38(15.75,-11.3) 39(15.75,-10) 40(15.75,-8.7) 41(15.75,-7.4) 42(15.75,-6.1) 43(15.75,-4.8) 44(15.75,-3.5) 45(15.75,-2.2) 46(15.75,-0.9) 47(15.75,0.4) 48(15.75,4.8) 49(15.75,6.1) 50(15.75,7.4) 51(15.75,8.7) 52(15.75,10) 53(15.75,11.3) 54(15.75,12.6) 141(-15.75,3) 142(-15.75,1.7) 143(15.75,1.7) 144(15.75,3)
  rect 0.8x2.5 smd: 19(-9.55,-14.25) 20(-8.25,-14.25) 21(-6.95,-14.25) 22(-5.65,-14.25) 23(-4.35,-14.25) 24(-3.05,-14.25) 25(-1.75,-14.25) 26(-0.45,-14.25) 27(0.85,-14.25) 28(2.15,-14.25) 29(3.45,-14.25) 30(4.75,-14.25) 31(6.05,-14.25) 32(7.35,-14.25) 33(8.65,-14.25) 34(9.95,-14.25) 35(11.25,-14.25) 36(12.55,-14.25) 55(12.55,14.25) 56(11.25,14.25) 57(9.95,14.25) 58(8.65,14.25) 59(7.35,14.25) 60(6.05,14.25) 61(4.75,14.25) 62(3.45,14.25) 63(2.15,14.25) 64(0.85,14.25) 65(-0.45,14.25) 66(-1.75,14.25) 67(-3.05,14.25) 68(-4.35,14.25) 69(-5.65,14.25) 70(-6.95,14.25) 71(-8.25,14.25) 72(-9.55,14.25) 113(-10.85,14.25) 114(-12.15,14.25) 115(-10.85,-14.25) 116(-12.15,-14.25)
  rect 2x3.3 smd: 85(8.2,9.6) 86(8.2,4.8) 87(8.2,0) 88(8.2,-4.8) 89(8.2,-9.6) 90(5,9.6) 91(5,4.8) 92(5,0) 93(5,-4.8) 94(5,-9.6) 95(1.6,9.6) 96(1.6,4.8) 97(1.6,-4.8) 98(1.6,-9.6) 99(-1.6,9.6) 100(-1.6,4.8) 101(-1.6,-4.8) 102(-1.6,-9.6) 103(-5,9.6) 104(-5,4.8) 105(-5,0) 106(-5,-4.8) 107(-5,-9.6) 108(-8.2,9.6) 109(-8.2,4.8) 110(-8.2,0) 111(-8.2,-4.8) 112(-8.2,-9.6)
  silkscreen extent -17.98,-14.6 16.1,14.61, body extent -16,-14.5 16,14.5, height 2.4
WJ301V-5.0-2P [mm]
  round 2.5 hole 1.3: 1(-5,0) 2(0,0)
  silkscreen extent -8.07,-3.5 2.5,3.99, body extent -8.1,-3.5 2.5,4, height 10
WJ301V-5.0-3P [mm]
  round 2.5 hole 1.3: 1(0,0) 2(5,0) 3(10,0)
  silkscreen extent -3.1,-3.45 12.5,4.06, body extent -3.1,-3.44 12.5,4.05, height 10

## Part data
C1 C3 C6 C10 C11 C12 C13 C14 C15 C18 C20 C24 C29 C30 C32 C36 C39 CF1: library part CC0402KRX7R7BB104, "CAP CER 0.1UF 16V X7R 0402", Capacitance=100nF, Case/Package=0402, Case Code (Metric)=1005, Dielectric=X7R, Manufacturer=Yageo, Max Operating Temperature=125°C, Min Operating Temperature=-55°C, Package Quantity=1, Supplier Part Number 1=311-1338-1-ND, Tolerance=10%, Voltage=16V, Case Code (Imperial)=0402, ComponentLink1Description=http://www.yageo.com/documents/recent/UPY-GPHC_X7R_6.3V-to-50V_8.pdf?src-supplier=Avnet+Europe, ComponentLink1URL=http://www.yageo.com/documents/recent/UPY-GPHC_X7R_6.3V-to-50V_8.pdf?src-supplier=Avnet+Europe, ComponentLink2Description=http://www.yageo.com/documents/recent/UPY-GPHC_X7R_6.3V-to-50V_18.pdf?src-supplier=Digi-Key, ComponentLink2URL=http://www.yageo.com/documents/recent/UPY-GPHC_X7R_6.3V-to-50V_18.pdf?src-supplier=Digi-Key, ComponentLink3Description=http://www.yageo.com/documents/recent/UPY-GPHC_X7R_6.3V-to-50V_8.pdf?src-supplier=Avnet, ComponentLink3URL=http://www.yageo.com/documents/recent/UPY-GPHC_X7R_6.3V-to-50V_8.pdf?src-supplier=Avnet, ComponentLink4Description=http://www.yageo.com/documents/recent/UPY-GPHC_X7R_6.3V-to-50V_18.pdf?src-supplier=Mouser, ComponentLink4URL=http://www.yageo.com/documents/recent/UPY-GPHC_X7R_6.3V-to-50V_18.pdf?src-supplier=Mouser, ComponentLink5Description=http://www.farnell.com/datasheets/2167236.pdf?src-supplier=Element14, ComponentLink5URL=http://www.farnell.com/datasheets/2167236.pdf?src-supplier=Element14, ComponentLink6Description=http://www.farnell.com/datasheets/1489800.pdf?src-supplier=Element14, ComponentLink6URL=http://www.farnell.com/datasheets/1489800.pdf?src-supplier=Element14, Composition=Ceramic, Depth=0.5mm, Halogen Free="Halogen Free", Height=0.5mm, Lead Free="Lead Free", Length=1mm, Manufacturer Part Number=CC0402KRX7R7BB104, Mount="Surface Mount", Number of Pins=2, Packaging="Tape and Reel", Pricing 1="1=0.1, 10=0.034, 100=0.015, 500=0.0107, 1000=0.00841, 2500=0.00764, 5000=0.00703 (USD)", Radiation Hardening=No, REACH SVHC="No SVHC", Stock 1=16982736, Supplier 1=Digi-Key, Termination=SMD/SMT, Thickness=0.022inch, Voltage Rating=16V, Voltage Rating (DC)=16V, Width=0.02inch
C2 C4: library part GRM155R61E105KA12D, "CAP CER 1UF 25V X5R 0402", Case/Package=0402, Case Code (Metric)=1005, Dielectric=X5R, Manufacturer=Murata, Max Operating Temperature=85°C, Min Operating Temperature=-55°C, Package Quantity=10000, Supplier Part Number 1=490-10017-1-ND, Tolerance=10%, Voltage=25V, Capacitance=1uF, Case Code (Imperial)=0402, ComponentLink1Description=http://www.farnell.com/datasheets/2048341.pdf?src-supplier=Element14, ComponentLink1URL=http://www.farnell.com/datasheets/2048341.pdf?src-supplier=Element14, Depth=0.5mm, Height=0.5mm, Lead Free="Lead Free", Length=1mm, Manufacturer Part Number=GRM155R61E105KA12D, Material=Ceramic, Mount="Surface Mount", Packaging="Tape and Reel", Pricing 1="1=0.11, 10=0.077, 100=0.0363, 500=0.02546, 1000=0.02108, 2500=0.01962, 5000=0.01795 (USD)", REACH SVHC="No SVHC", Stock 1=1194305, Supplier 1=Digi-Key, Termination=SMD/SMT, Thickness=0.022inch, Voltage Rating=25V, Voltage Rating (DC)=25V, Weight=0.000212oz, Width=0.5mm
C5 C27 CF6 CF7: library part CC0402KRX7R8BB103, "CAP CER 10000PF 25V X7R 0402", Case/Package=0402, Case Code (Metric)=1005, Dielectric=X7R, Manufacturer=Yageo, Max Operating Temperature=125°C, Min Operating Temperature=-55°C, Package Quantity=1, Supplier Part Number 1=311-1337-1-ND, Tolerance=10%, Voltage Rating=25V, Capacitance=10nF, Case Code (Imperial)=0402, ComponentLink1Description=http://www.yageo.com/documents/recent/UPY-GPHC_X7R_6.3V-to-50V_18.pdf?src-supplier=Digi-Key, ComponentLink1URL=http://www.yageo.com/documents/recent/UPY-GPHC_X7R_6.3V-to-50V_18.pdf?src-supplier=Digi-Key, ComponentLink2Description=https://www.verical.com/server-webapp/html/getDatasheet?partID=375418&src-supplier=Verical, ComponentLink2URL=https://www.verical.com/server-webapp/html/getDatasheet?partID=375418&src-supplier=Verical, ComponentLink3Description=http://www.yageo.com/documents/recent/UPY-GPHC_X7R_6.3V-to-50V_8.pdf?src-supplier=Avnet, ComponentLink3URL=http://www.yageo.com/documents/recent/UPY-GPHC_X7R_6.3V-to-50V_8.pdf?src-supplier=Avnet, ComponentLink4Description=https://4donline.ihs.com/images/VipMasterIC/IC/YAGO/YAGO-S-A0003557223/YAGO-S-A0003557223-1.pdf?hkey=52A5661711E402568146F3353EA87419&src-supplier=Element14, ComponentLink4URL=https://4donline.ihs.com/images/VipMasterIC/IC/YAGO/YAGO-S-A0003557223/YAGO-S-A0003557223-1.pdf?hkey=52A5661711E402568146F3353EA87419&src-supplier=Element14, ComponentLink5Description=http://www.farnell.com/datasheets/2167236.pdf?src-supplier=Element14, ComponentLink5URL=http://www.farnell.com/datasheets/2167236.pdf?src-supplier=Element14, ComponentLink6Description=http://www.mouser.com/ds/2/447/Yageo_UPY-GP_NP0_16V-to-50V_9-358835.pdf?src-supplier=Mouser, ComponentLink6URL=http://www.mouser.com/ds/2/447/Yageo_UPY-GP_NP0_16V-to-50V_9-358835.pdf?src-supplier=Mouser, Composition=Ceramic, Depth=0.5mm, Halogen Free="Halogen Free", Height=0.5mm, Lead Free="Lead Free", Length=1mm, Manufacturer Part Number=CC0402KRX7R8BB103, Mount="Surface Mount", Packaging="Tape and Reel", Pricing 1="1=0.1, 10=0.021, 100=0.0093, 500=0.00666, 1000=0.00523, 2500=0.00476, 5000=0.00438 (USD)", Radiation Hardening=No, REACH SVHC=Unknown, Stock 1=0, Supplier 1=Digi-Key, Termination=SMD/SMT, Thickness=0.022inch, Voltage Rating (DC)=25V, Width=0.02inch
C9 CF2: library part EMK107BBJ106MA-T, "CAP CER 10UF 16V X5R 0603", Case/Package=0603, Case Code (Metric)=1608, Dielectric=X5R, Manufacturer="Taiyo Yuden", Max Operating Temperature=85°C, Min Operating Temperature=-55°C, Package Quantity=1, Supplier Part Number 1=587-3238-1-ND, Tolerance=20%, Voltage Rating=16V, Capacitance=10uF, Case Code (Imperial)=0603, ComponentLink1Description=https://media.digikey.com/pdf/Data%20Sheets/Taiyo%20Yuden%20PDFs%20URL%20links/EMK107BBJ106MA-T.pdf?src-supplier=Digi-Key, ComponentLink1URL=https://media.digikey.com/pdf/Data%20Sheets/Taiyo%20Yuden%20PDFs%20URL%20links/EMK107BBJ106MA-T.pdf?src-supplier=Digi-Key, ComponentLink2Description=http://www.onlinecomponents.com/productFiles/mf-TAI/3emk107bbj106ma-t.pdf?src-supplier=Onlinecomponents.com, ComponentLink2URL=http://www.onlinecomponents.com/productFiles/mf-TAI/3emk107bbj106ma-t.pdf?src-supplier=Onlinecomponents.com, ComponentLink3Description=http://www.mouser.com/ds/2/396/mlcc11_hq_e-541564.pdf?src-supplier=Mouser, ComponentLink3URL=http://www.mouser.com/ds/2/396/mlcc11_hq_e-541564.pdf?src-supplier=Mouser, Halogen Free="Halogen Free", Height=0.8mm, Length=0.063inch, Manufacturer Part Number=EMK107BBJ106MA-T, Mount="Surface Mount", Packaging="Tape and Reel", Pricing 1="1=0.39, 10=0.269, 100=0.1617, 500=0.12126, 1000=0.10239 (USD)", REACH SVHC=Unknown, Stock 1=495661, Supplier 1=Digi-Key, Termination=SMD/SMT, Thickness=0.031inch, Voltage Rating (DC)=16V, Width=0.031inch
C16 C17: library part GJM0336C1E200JB01D, "CAP CER 20PF 25V C0H 0201", Case/Package=0201, Case Code (Metric)=0603, Manufacturer=Murata, Max Operating Temperature=125°C, Min Operating Temperature=-55°C, Supplier Part Number 1=490-13313-1-ND, Tolerance=5%, Voltage Rating=25V, Capacitance=20pF, Case Code (Imperial)=0201, ComponentLink1Description=http://www.mouser.com/ds/2/281/c02e-2905.pdf?src-supplier=Mouser, ComponentLink1URL=http://www.mouser.com/ds/2/281/c02e-2905.pdf?src-supplier=Mouser, ComponentLink2Description=http://search.murata.co.jp/Ceramy/image/img/A01X/partnumbering_e_01.pdf?src-supplier=Digi-Key, ComponentLink2URL=http://search.murata.co.jp/Ceramy/image/img/A01X/partnumbering_e_01.pdf?src-supplier=Digi-Key, Lead Free="Lead Free", Length=0.024inch, Manufacturer Part Number=GJM0336C1E200JB01D, Mount="Surface Mount", Packaging="Tape and Reel", Pricing 1="1=0.1, 10=0.074, 100=0.0329, 500=0.02348, 1000=0.01845, 2500=0.01678, 5000=0.01543 (USD)", Stock 1=13650, Supplier 1=Digi-Key, Termination=SMD/SMT, Thickness=0.013inch, Voltage Rating (DC)=25V, Width=0.012inch
C19 C23: library part 16TQC100MYF, "CAP TANT POLY 100UF 16V 2917", Case/Package=2917, Case Code (Metric)=7343, ESR (Equivalent Series Resistance)=50mR, Leakage Current=160uA, Manufacturer=Panasonic, Max Operating Temperature=105°C, Min Operating Temperature=-55°C, Package Quantity=3000, Ripple Current=1.8A, Supplier Part Number 1=P16237CT-ND, Tolerance=20%, Voltage=16V, Capacitance=100uF, Case Code (Imperial)=2917, ComponentLink1Description=http://industrial.panasonic.com/www-data/pdf/AAA8000/AAA8000CE14.pdf?src-supplier=Avnet, ComponentLink1URL=http://industrial.panasonic.com/www-data/pdf/AAA8000/AAA8000CE14.pdf?src-supplier=Avnet, ComponentLink2Description=http://www.farnell.com/datasheets/2059641.pdf?src-supplier=Farnell, ComponentLink2URL=http://www.farnell.com/datasheets/2059641.pdf?src-supplier=Farnell, ComponentLink3Description=http://www.farnell.com/datasheets/1734368.pdf?src-supplier=Element14, ComponentLink3URL=http://www.farnell.com/datasheets/1734368.pdf?src-supplier=Element14, Depth=4.3mm, Dissipation Factor=10%, Features="General Purpose", Height=1.9mm, Height - Seated (Max)=0.079inch, Lead Free="Lead Free", Length=7.3mm, Life (Hours)=2000Hour, Manufacturer Part Number=16TQC100MYF, Material=Polymer, Mount="Surface Mount", Number of Pins=2, Packaging="Tape and Reel", Polarity=Polar, Pricing 1="1=3.55, 10=2.859, 100=2.2299, 500=1.65816, 1000=1.54381 (USD)", Radiation Hardening=No, REACH SVHC="No SVHC", Stock 1=103103, Supplier 1=Digi-Key, Termination=SMD/SMT, Voltage Rating=16V, Voltage Rating (DC)=16V, Width=4.3mm
C21 C25: library part 0402N100J250CT, "10pF ±5% 25V NP0(C0G) 0402 Multilayer Ceramic Capacitors MLCC - SMD/SMT RoHS", Manufacturer="Walsin Tech Corp", Package=0402, Manufacturer Part No=0402N100J250CT
C22 C26 C33 C34 C35: library part 0402N330K250CT, "33pF ±10% 25V NP0(C0G) 0402 Multilayer Ceramic Capacitors MLCC - SMD/SMT RoHS", Manufacturer="Walsin Tech Corp", Package=0402, Manufacturer Part No=0402N330K250CT
C31: library part CL10A475KA8NQNC, "CAP CER 4.7UF 25V X5R 0603", Capacitance=4.7uF, Case/Package=0603, Case Code (Metric)=1608, Dielectric=X5R, Manufacturer=Samsung, Max Operating Temperature=85°C, Min Operating Temperature=-55°C, Package Quantity=1, Supplier Part Number 1=1276-1900-1-ND, Tolerance=10%, Voltage Rating=25V, Case Code (Imperial)=0603, ComponentLink1Description=http://www.samsungsem.com/kr/support/product-search/mlcc/CL10A475KA8NQNC.jsp?src-supplier=Digi-Key, ComponentLink1URL=http://www.samsungsem.com/kr/support/product-search/mlcc/CL10A475KA8NQNC.jsp?src-supplier=Digi-Key, Contact Plating=Tin, Depth=0.8mm, Lead Free="Lead Free", Length=1.6mm, Manufacturer Part Number=CL10A475KA8NQNC, Mount="Surface Mount", Packaging="Tape and Reel", Pricing 1="1=0.37, 10=0.255, 100=0.1528, 500=0.11456, 1000=0.09675 (USD)", Stock 1=2252340, Supplier 1=Digi-Key, Termination=Wraparound, Thickness=0.035inch, Width=0.031inch
C37 C40: library part GRM21BR61E226ME44L, "CAP CER 22UF 25V X5R 0805", Case/Package=0805, Case Code (Metric)=2012, Dielectric=X5R, Manufacturer=Murata, Max Operating Temperature=85°C, Min Operating Temperature=-55°C, Package Quantity=3000, Supplier Part Number 1=490-10749-1-ND, Tolerance=20%, Voltage=25V, Capacitance=22uF, Case Code (Imperial)=0805, ComponentLink1Description=http://www.farnell.com/datasheets/2048737.pdf?src-supplier=Farnell, ComponentLink1URL=http://www.farnell.com/datasheets/2048737.pdf?src-supplier=Farnell, ComponentLink2Description=http://www.farnell.com/datasheets/2048737.pdf?src-supplier=Element14, ComponentLink2URL=http://www.farnell.com/datasheets/2048737.pdf?src-supplier=Element14, Composition=Ceramic, Depth=1.25mm, Height=1.25mm, Lead Free="Lead Free", Length=2mm, Manufacturer Part Number=GRM21BR61E226ME44L, Material=Ceramic, Mount="Surface Mount", Packaging="Tape and Reel", Pricing 1="1=0.54, 10=0.383, 100=0.2521, 500=0.18672, 1000=0.15871 (USD)", REACH SVHC="No SVHC", Stock 1=469852, Supplier 1=Digi-Key, Termination=SMD/SMT, Thickness=0.057inch, Voltage Rating=25V, Voltage Rating (DC)=25V, Weight=0.000335oz, Width=1.25mm
C38: library part TAJB475K035RNJ, "CAP TANT 4.7UF 10% 35V 1411", Capacitance=4.7uF, Case/Package=1210, Case Code (Metric)=3528, Dielectric Material=Tantalum, ESR (Equivalent Series Resistance)=3.1R, Leakage Current=1.6uA, Manufacturer="Kyocera AVX", Max Operating Temperature=125°C, Min Operating Temperature=-55°C, Package Quantity=1, Supplier Part Number 1=478-1691-1-ND, Tolerance=20%, Voltage=35V, Case Code (Imperial)=1210, ComponentLink1Description=http://uk.rs-online.com/webdocs/0ccd/0900766b80ccdc61.pdf?src-supplier=RSComponents, ComponentLink1URL=http://uk.rs-online.com/webdocs/0ccd/0900766b80ccdc61.pdf?src-supplier=RSComponents, ComponentLink2Description=http://www.farnell.com/datasheets/1826076.pdf?src-supplier=Element14, ComponentLink2URL=http://www.farnell.com/datasheets/1826076.pdf?src-supplier=Element14, ComponentLink3Description=http://datasheets.avx.com/TAJ.pdf?src-supplier=Digi-Key, ComponentLink3URL=http://datasheets.avx.com/TAJ.pdf?src-supplier=Digi-Key, ComponentLink4Description=http://www.avx.com/docs/Catalogs/taj.pdf?src-supplier=Farnell, ComponentLink4URL=http://www.avx.com/docs/Catalogs/taj.pdf?src-supplier=Farnell, ComponentLink5Description=https://www.alliedelec.com/m/d/9166fb755e7ffffad4c533f86d810ce4.pdf?src-supplier=Allied+Electronics, ComponentLink5URL=https://www.alliedelec.com/m/d/9166fb755e7ffffad4c533f86d810ce4.pdf?src-supplier=Allied+Electronics, ComponentLink6Description=https://www.distrelec.biz/Web/Downloads/_e/ng/taj_ENG.pdf?mime=application%2Fpdf&src-supplier=Distrelec, ComponentLink6URL=https://www.distrelec.biz/Web/Downloads/_e/ng/taj_ENG.pdf?mime=application%2Fpdf&src-supplier=Distrelec, ComponentLink7Description=http://www.avx.com/docs/catalogs/taj.pdf?src-supplier=Avnet+Europe, ComponentLink7URL=http://www.avx.com/docs/catalogs/taj.pdf?src-supplier=Avnet+Europe, ComponentLink8Description=http://www.avx.com/docs/catalogs/taj.pdf?src-supplier=Avnet, ComponentLink8URL=http://www.avx.com/docs/catalogs/taj.pdf?src-supplier=Avnet, ComponentLink9Description=http://www.avxcorp.com/docs/Catalogs/taj.pdf?src-supplier=Future+Electronics, ComponentLink9URL=http://www.avxcorp.com/docs/Catalogs/taj.pdf?src-supplier=Future+Electronics, ComponentLink10Description=http://www.mouser.com/ds/2/40/taj-776811.pdf?src-supplier=Mouser, ComponentLink10URL=http://www.mouser.com/ds/2/40/taj-776811.pdf?src-supplier=Mouser, ComponentLink11Description=https://www.verical.com/server-webapp/html/getDatasheet?partID=149140&src-supplier=Verical, ComponentLink11URL=https://www.verical.com/server-webapp/html/getDatasheet?partID=149140&src-supplier=Verical, Depth=2.8mm, Dissipation Factor=6%, Features="General Purpose", Height=1.9mm, Height - Seated (Max)=0.083inch, Lead Free="Lead Free", Length=3.5mm, Manufacturer Part Number=TAJB475K035RNJ, Mount="Surface Mount,PCB", Number of Pins=2, Packaging="Tape and Reel", Polarity=Polar, Pricing 1="1=0.71, 10=0.505, 100=0.3322, 500=0.2461, 1000=0.20919 (USD)", Radiation Hardening=No, REACH SVHC="No SVHC", Stock 1=3949, Supplier 1=Digi-Key, Termination=SMD/SMT, Voltage Rating=35V, Voltage Rating (DC)=35V, Weight=0.000564oz, Width=2.8mm
CF3: library part T491X227M016AT, "CAP TANT 220UF 20% 16V 2917", Case/Package=2917, Case Code (Metric)=7343, Dielectric Material=Tantalum, ESR (Equivalent Series Resistance)=500mR, Leakage Current=35.2uA, Manufacturer=KEMET, Max Operating Temperature=125°C, Min Operating Temperature=-55°C, Package Quantity=1, Ripple Current=574mA, Supplier Part Number 1=399-10210-1-ND, Tolerance=20%, Voltage Rating=16V, Capacitance=220uF, Case Code (Imperial)=2917, ComponentLink1Description=https://search.kemet.com/component-edge/download/datasheet/T491X227M016AT.pdf?src-supplier=Digi-Key, ComponentLink1URL=https://search.kemet.com/component-edge/download/datasheet/T491X227M016AT.pdf?src-supplier=Digi-Key, ComponentLink2Description=http://www.mouser.com/ds/2/212/KEM_T2005_T491-1093550.pdf?src-supplier=Mouser, ComponentLink2URL=http://www.mouser.com/ds/2/212/KEM_T2005_T491-1093550.pdf?src-supplier=Mouser, Depth=4.3mm, Dissipation Factor=10%, Features="General Purpose", Height=4.3mm, Height - Seated (Max)=0.169inch, Lead Free="Lead Free", Length=7.3mm, Life (Hours)=2000Hour, Manufacturer Part Number=T491X227M016AT, Mount="Surface Mount", Number of Pins=2, Packaging="Tape and Reel", Polarity=Polar, Pricing 1="1=2.53, 10=2.045, 100=1.5613 (USD)", Radiation Hardening=No, REACH SVHC="No SVHC", Stock 1=16347, Supplier 1=Digi-Key, Termination=SMD/SMT, Voltage Rating (DC)=16V, Width=0.169inch
CF17: library part CC0402JRNPO9BN221, "CAP CER 220PF 50V C0G/NPO 0402", Case/Package=0402, Case Code (Metric)=1005, Dielectric=C0G, Dielectric Material=Ceramic, Insulation Resistance=10GR, Manufacturer=Yageo, Max Operating Temperature=125°C, Min Operating Temperature=-55°C, Package Quantity=1, Supplier Part Number 1=311-1416-1-ND, Temperature Coefficient=30ppm/°C, Tolerance=10%, Voltage=50V, Capacitance=220pF, Case Code (Imperial)=0402, ComponentLink1Description=http://www.yageo.com/documents/recent/UPY-GP_NP0_16V-to-50V_16.pdf?src-supplier=Digi-Key, ComponentLink1URL=http://www.yageo.com/documents/recent/UPY-GP_NP0_16V-to-50V_16.pdf?src-supplier=Digi-Key, ComponentLink2Description=http://www.yageo.com/documents/recent/UPY-GP_NP0_16V-to-50V_8.pdf?src-supplier=Avnet+Europe, ComponentLink2URL=http://www.yageo.com/documents/recent/UPY-GP_NP0_16V-to-50V_8.pdf?src-supplier=Avnet+Europe, ComponentLink3Description=http://www.farnell.com/datasheets/1132289.pdf?src-supplier=Element14, ComponentLink3URL=http://www.farnell.com/datasheets/1132289.pdf?src-supplier=Element14, ComponentLink4Description=http://www.farnell.com/datasheets/2213336.pdf?src-supplier=Element14, ComponentLink4URL=http://www.farnell.com/datasheets/2213336.pdf?src-supplier=Element14, Depth=0.5mm, Dissipation Factor=0.1%, Height=0.5mm, Lead Free="Lead Free", Length=1mm, Manufacturer Part Number=CC0402JRNPO9BN221, Mount="Surface Mount", Number of Pins=2, Packaging="Tape and Reel", Pricing 1="1=0.1, 10=0.039, 100=0.0172, 500=0.01228, 1000=0.00965, 2500=0.00877, 5000=0.00807 (USD)", Radiation Hardening=No, REACH SVHC="No SVHC", Stock 1=97268, Supplier 1=Digi-Key, Termination=SMD/SMT, Thickness=0.022inch, Voltage Rating=50V, Width=0.02inch
CX1 CX2: library part CC0603JRNPO9BN120, "CAP CER 12PF 50V C0G/NPO 0603", Dielectric=C0G, Dielectric Material=Ceramic, Insulation Resistance=100GR, Manufacturer=Yageo, Manufacturer Part Number=CC0603J*NPO9B*120, Supplier Part Number 1=311-1059-1-ND, Tolerance=5%, Voltage Rating (DC)=50V, Capacitance=12pF, ComponentLink1Description=http://www.kemet.com/kemet/web/homepage/kechome.nsf/file/F9080B_0402_Series_C0G/$file/F9080B_0402_Series_C0G.pdf?src-supplier=Element14, ComponentLink1URL=http://www.kemet.com/kemet/web/homepage/kechome.nsf/file/F9080B_0402_Series_C0G/$file/F9080B_0402_Series_C0G.pdf?src-supplier=Element14, ComponentLink2Description=http://www.farnell.com/datasheets/1372242.pdf?src-supplier=Element14, ComponentLink2URL=http://www.farnell.com/datasheets/1372242.pdf?src-supplier=Element14, Lead Free="Lead Free", Number of Pins=2, Packaging="Cut Tape", Pricing 1="1=0.1, 10=0.065, 100=0.0288, 500=0.0206, 1000=0.0162 (USD)", REACH SVHC="No SVHC", Stock 1=141041, Supplier 1=Digi-Key
D1 D3: "DIODE SCHOTTKY 30V 1A SOD123W", Manufacturer=Nexperia, Supplier Part Number 1=1727-5201-1-ND, Manufacturer Part Number=PMEG3010ER,115, Pricing 1="1=0.36, 10=0.29, 100=0.1669, 500=0.1545, 1000=0.10506 (USD)", Stock 1=75070, Supplier 1=Digi-Key
D2: "5.1V 800mW 5uA @ 1V SOD-123FL Zener Diodes RoHS", Manufacturer="PANJIT International", Package=SOD-123FL, Manufacturer Part No=BZD27C5V1P_R1_00001
DF1: "DIODE SCHOTTKY 40V 3A SMA", Average Rectified Current=3A, Capacitance=250pF, Case/Package=SMA, Forward Voltage=500mV, Manufacturer=Diodes, Max Forward Surge Current (Ifsm)=80A, Max Operating Temperature=125°C, Max Repetitive Reverse Voltage (Vrrm)=40V, Min Operating Temperature=-55°C, Package Quantity=5000, Peak Reverse Current=500uA, Supplier Part Number 1=B340A-FDICT-ND, ComponentLink1Description=http://components.arrow.com/part/dataview/41507737S9851045N2867?src-supplier=Arrow, ComponentLink1URL=http://components.arrow.com/part/dataview/41507737S9851045N2867?src-supplier=Arrow, ComponentLink2Description=http://www.farnell.com/datasheets/2238474.pdf?src-supplier=Element14, ComponentLink2URL=http://www.farnell.com/datasheets/2238474.pdf?src-supplier=Element14, ComponentLink3Description=http://www.farnell.com/datasheets/2238474.pdf?src-supplier=Newark, ComponentLink3URL=http://www.farnell.com/datasheets/2238474.pdf?src-supplier=Newark, ComponentLink4Description=https://www.diodes.com/assets/Datasheets/ds30891.pdf?src-supplier=Digi-Key, ComponentLink4URL=https://www.diodes.com/assets/Datasheets/ds30891.pdf?src-supplier=Digi-Key, ComponentLink5Description=https://www.verical.com/server-webapp/html/getDatasheet?partID=143394&src-supplier=Verical, ComponentLink5URL=https://www.verical.com/server-webapp/html/getDatasheet?partID=143394&src-supplier=Verical, Contact Plating=Tin,Matte, Current=3A, Current Rating=3A, Element Configuration=Single, Forward Current=3A, Height=2.3mm, Lead Free="Lead Free", Length=4.6mm, Manufacturer Part Number=B340A-13-F, Max Reverse Voltage (DC)=40V, Mount="Surface Mount", Number of Pins=2, Output Current=3A, Packaging="Tape and Reel", Peak Non-Repetitive Surge Current=80A, Polarity=Standard, Pricing 1="1=0.41, 10=0.332, 25=0.304, 100=0.1909, 250=0.18876, 500=0.17676, 1000=0.12019, 2500=0.11524 (USD)", Radiation Hardening=No, REACH SVHC="No SVHC", Stock 1=369635, Supplier 1=Digi-Key, Termination=SMD/SMT, Voltage=40V, Voltage Rating (DC)=40V, Weight=0.002258oz, Width=2.92mm
J1: "CONN U.FL RCPT STR 50 OHM SMD", Case/Package=SMD/SMT, Manufacturer=Hirose, Package Quantity=10000, Supplier Part Number 1=U.FL-R-SMT-1(80)-CUTT, ComponentLink1Description=https://www.hirose.com/product/en/download_file/key_name/U.FL-R-SMT-1%2880%29/category/Specification%20Sheet/doc_file_id/37638/?file_category_id=9&item_id=03310472280&is_series=&src-supplier=Digi-Key, ComponentLink1URL=https://www.hirose.com/product/en/download_file/key_name/U.FL-R-SMT-1%2880%29/category/Specification%20Sheet/doc_file_id/37638/?file_category_id=9&item_id=03310472280&is_series=&src-supplier=Digi-Key, ComponentLink2Description=http://www.mouser.com/ds/2/185/U.FL_catalog-939761.pdf?src-supplier=Mouser, ComponentLink2URL=http://www.mouser.com/ds/2/185/U.FL_catalog-939761.pdf?src-supplier=Mouser, Lead Free="Lead Free", Manufacturer Part Number=U.FL-R-SMT-1(80), Packaging="Tape and Reel", Pricing 1="1=1.07, 500=0.785, 1500=0.74, 2500=0.72, 5000=0.695 (USD)", Stock 1=1272, Supplier 1="Future Electronics"
J3: "USB - Micro B Female USB 2 5 SMD USB Connectors RoHS", Manufacturer="Jing Extension of the Electronic Co.", ComponentLink1Description=http://www.amphenol-icc.com/media/wysiwyg/files/drawing/10118194.pdf?src-supplier=Digi-Key, ComponentLink1URL=http://www.amphenol-icc.com/media/wysiwyg/files/drawing/10118194.pdf?src-supplier=Digi-Key, ComponentLink2Description=https://cdn.amphenol-icc.com/media/wysiwyg/files/drawing/10118194.pdf?src-supplier=Mouser, ComponentLink2URL=https://cdn.amphenol-icc.com/media/wysiwyg/files/drawing/10118194.pdf?src-supplier=Mouser, ComponentLink3Description=https://cdn.amphenol-icc.com/media/wysiwyg/files/drawing/10118194.pdf?src-supplier=Verical, ComponentLink3URL=https://cdn.amphenol-icc.com/media/wysiwyg/files/drawing/10118194.pdf?src-supplier=Verical, Connector Type=USB,Receptacle, Gender=Receptacle, Link=https://lcsc.com/product-detail/USB-Connectors_Jing-Extension-of-the-Electronic-Co-C10418_C10418.html, Manufacturer Part Number=C10418, Mount="Surface Mount,Horizontal", Number of Contacts=5, Number of Ports=1, Number of Terminals=5, Orientation="Right Angle", Termination=Solder
J4: "CONN HEADER SMD 10POS 1.27MM"
J5: "CBL PLUG-OF-NAILS 10-PIN W/LEGS", Manufacturer=Tag-Connect, Package Quantity=1, Supplier Part Number 1=TC2050-IDC-ND, ComponentLink1Description=http://www.tag-connect.com/Materials/TC2050-IDC%20Datasheet.pdf?src-supplier=Digi-Key, ComponentLink1URL=http://www.tag-connect.com/Materials/TC2050-IDC%20Datasheet.pdf?src-supplier=Digi-Key, Manufacturer Part Number=TC2050-IDC, Pricing 1="1=40.17 (USD)", Stock 1=59, Supplier 1=Digi-Key
J6: "SMD Battery Holders, Clips & Contacts RoHS", Manufacturer=Q&J, Package=Cuctom, Manufacturer Part No=CR1220-2
J7 J8: "P=5.0mm Screw terminal RoHS", Manufacturer="Ningbo Kangnex Elec", Package=Custom
  J7: Manufacturer Part No=WJ301V-5.0-3P
  J8: Manufacturer Part No=WJ301V-5.0-2P
J11: "CONN PWR JACK 2.1X5.5MM SOLDER", Color=Black, Current Rating=5A, Flammability Rating="UL94 V-0", Insulation Resistance=100MR, Manufacturer="Wurth Electronics", Max Operating Temperature=85°C, Min Operating Temperature=-40°C, Package Quantity=500, Supplier Part Number 1=732-5930-ND, Voltage Rating=24V, Voltage Rating (DC)=20V, ComponentLink1Description=https://katalog.we-online.de/em/datasheet/6941xx301002.pdf?src-supplier=Digi-Key, ComponentLink1URL=https://katalog.we-online.de/em/datasheet/6941xx301002.pdf?src-supplier=Digi-Key, ComponentLink2Description=http://www.farnell.com/cad/2130967.pdf?src-supplier=Element14, ComponentLink2URL=http://www.farnell.com/cad/2130967.pdf?src-supplier=Element14, ComponentLink3Description=http://www.mouser.com/ds/2/445/6941xx301002-469315.pdf?src-supplier=Mouser, ComponentLink3URL=http://www.mouser.com/ds/2/445/6941xx301002-469315.pdf?src-supplier=Mouser, Connector Type=Jack,Power, Contact Gender=Female, Contact Material="Copper Alloy", Contact Plating=Tin, Gender=Male, Housing Material=Polyamide, Manufacturer Part Number=694106301002, Mount="Through Hole", Packaging=Bulk, Pricing 1="1=0.96, 10=0.908, 50=0.811, 100=0.746, 500=0.648, 1000=0.551 (USD)", REACH SVHC=Unknown, Shielding=Unshielded, Stock 1=4679, Supplier 1=Digi-Key, Termination="Through Hole"
L1: "10uH ±20% 1.6A 230mO SMD,4.75x4.2x2mm Inductors (SMD) RoHS", Manufacturer=COILMX, Package=Custom, Manufacturer Part No=MS0420-100M
L2: "15uH ±20% 2.5A 56mO SMD,8.0x8.0mm Inductors (SMD) RoHS", Manufacturer="3L COILS", Package=Custom, Manufacturer Part No=SNR8040K-150M
LED1 LED2: "Red 625nm 0402 Light Emitting Diodes (LED) RoHS", Manufacturer=TOGIALED, Package=0402, Manufacturer Part No=TJ-S1005SW4TGLC2R-A5
LED3: "Blue 465nm 0402 Light Emitting Diodes (LED) RoHS", Manufacturer=TOGIALED, Package=0402, Manufacturer Part No=TJ-S1005SW4TGLC6B-A5
LED4 LEDF1: "Green 573nm 0402 Light Emitting Diodes (LED) RoHS", Manufacturer=TOGIALED, Package=0402, Manufacturer Part No=TJ-S1005SW4TGLC7K-A5